# Altium PCB DT10966_MOTOR_CONTROLLER.PcbDoc (part 4 of 8)
Units mm, origin at the board's own origin, x right, y up, seen from the top; angles counter-clockwise.
Board outline 300 x 19 mm, 10 copper layers (Top Layer, Layer 2 GND, Layer 3 SIG, Layer 4 GND, Layer 5 PWR, Layer 6 PWR, Layer 7 GND, Layer 8 SIG, Layer 9 GND, Bottom Layer), stack 2.418 mm thick; 745 components, 446 nets, 2132 pads, 1222 vias.
Unrouted connection lines stored in the file: 3.
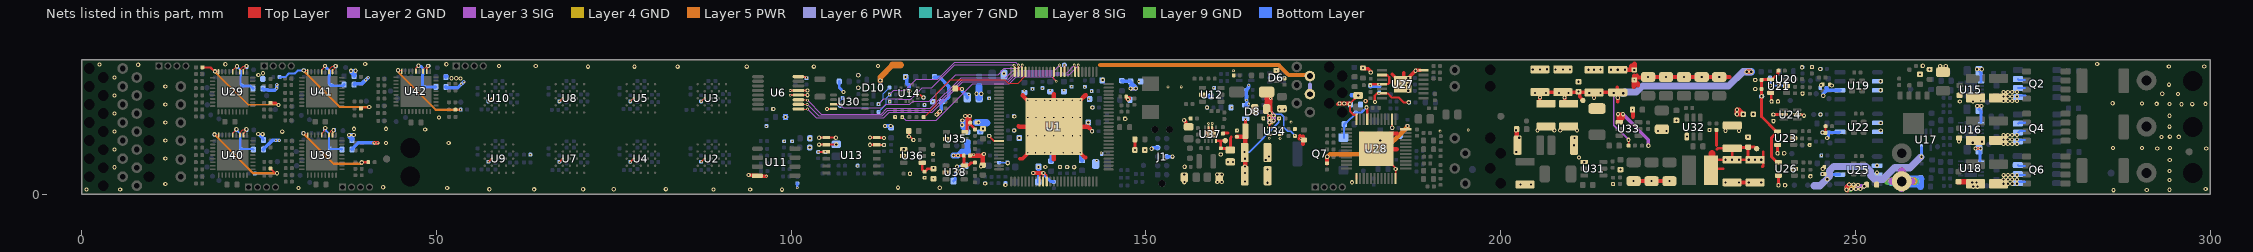
[diagram p11: the nets of this part, all layers, seen from the top]

## Part data (continued)
U20: library part REF3333AIDBZR, "IC VREF SERIES 0.15% SOT23-3", Manufacturer="Texas Instruments", MPN=REF3333AIDBZR
U21 U23 U26: library part CMP-001-2009-1, "IC COMPARATOR 1 GEN PUR SOT23-5", Current - Input Bias (Max)="0.005µA @ 5V", Current - Output (Typ)=21mA, Current - Quiescent (Max)=40µA, Manufacturer="Texas Instruments", Op Temp max=125°C, Op Temp min=-40°C, Package="SC-74A, SOT-753", Ratings=-, Voltage - Input Offset (Max)="1mV @ 5V", Voltage - Supply, Single/Dual (±)="2.7V ~ 5.5V", CMRR, PSRR (Typ)="70dB CMRR, 85dB PSRR", ComponentLink1Description=Datasheet, ComponentLink1URL=https://www.ti.com/lit/ds/symlink/tlv3201.pdf?HQS=dis-dk-null-digikeymode-dsf-pf-null-wwe&ts=1745660417910&ref_url=https%253A%252F%252Fwww.ti.com%252Fgeneral%252Fdocs%252Fsuppproductinfo.tsp%253FdistId%253D10%2526gotoUrl%253Dhttps%253A%252F%252Fwww.ti.com%252Flit%252Fgpn%252Ftlv3201, ComponentLink2Description=Mouser, ComponentLink2URL=https://eu.mouser.com/ProductDetail/Texas-Instruments/TLV3201AIDBVR?qs=5771e39Rz9GGuYwPEKy7fA%3D%3D, ComponentLink3Description=Digikey, ComponentLink3URL=https://www.digikey.com/en/products/detail/texas-instruments/TLV3201AIDBVR/3188691?s=N4IgTCBcDaICoBkBqBmMAGAjAQQJIBEAhJAJRAF0BfIA, Hysteresis=1.2mV, Mounting Type=SM, MPN=TLV3201AIDBVR, Number of Elements=1, Output Type=Push-Pull, Propagation Delay (Max)=50ns
U24: "IC GATE OR 1CH 3-INP SC70-6", Manufacturer="Texas Instruments", MPN=SN74LVC1G332DCKR
U27: "IC OPAMP GP 2 CIRCUIT 14HTSSOP", Manufacturer="Texas Instruments", MPN=ALM2403QPWPRQ1
U28: "IC SGNL CONDITIONER LVDT 48HTQFP", Manufacturer="Texas Instruments", MPN=PGA970QPHPR
U29 U39 U40 U41 U42: "IC PROG SENSOR SGNL COND 36VQFN", Manufacturer="Texas Instruments", MPN=PGA900ARHHR
U30: "IC RTC CLK/CALENDAR I2C 8TSSOP", Manufacturer="NXP USA Inc.", MPN=PCA8565TS/1,118
U31 U32 U33: "SIMPLE SWITCHER SYNCHRONOUS BUCK", Current - Output=3.5A, Frequency - Switching=400kHz, Manufacturer="Texas Instruments", Operating Temperature (MAX)="150°C (TJ)", Operating Temperature (MIN)="-40°C  (TJ)", Package / Case="SOT-23-6 Thin, TSOT-23-6", Voltage - Input (Max)=60V, Voltage - Input (Min)=4.3V, Voltage - Output (Max)=30V, Voltage - Output (Min/Fixed)=0.8V, ComponentLink1Description=Datasheet, ComponentLink1URL=https://www.ti.com/lit/ds/symlink/lmr51625.pdf?ts=1742888310253&ref_url=https%253A%252F%252Fwww.ti.com%252Fsitesearch%252Fen-us%252Fdocs%252Funiversalsearch.tsp%253FlangPref%253Den-US%2526nr%253D3%2526searchTerm%253DLMR51625XDDCR, ComponentLink2Description=DigiKey, ComponentLink2URL=https://www.digikey.com/en/products/detail/texas-instruments/LMR51635XDDCR/25811438?s=N4IgTCBcDaIDIFkBKBWAjANgMwoBoBF8BhJEAXQF8g, ComponentLink3Description=Mouser, ComponentLink3URL=https://eu.mouser.com/ProductDetail/Texas-Instruments/LMR51635XDDCR?qs=a2MtRaTmNORRY9iTmYV%2Fiw%3D%3D, Function=Step-Down, Mounting Type=SM, MPN=LMR51635XDDCR, Output Type=Adjustable, Synchronous Rectifier=Yes, Topology=Buck
U34: "IC REG BUCK ADJ 4A SOT563", Current - Output=4A, Frequency - Switching=1.2MHz, Manufacturer="Texas Instruments", Operating Temperature (MAX)="125°C (TJ)", Operating Temperature (MIN)="-40°C (TJ)", Package / Case="SOT-563, SOT-666", Voltage - Input (Max)=16V, Voltage - Input (Min)=3V, Voltage - Output (Max)=7V, Voltage - Output (Min/Fixed)=0.6V, ComponentLink1Description=Datsheet, ComponentLink1URL=https://www.ti.com/lit/ds/symlink/tps564242.pdf?ts=1750029010480, ComponentLink2Description=DigiKey, ComponentLink2URL=https://www.digikey.at/en/products/detail/texas-instruments/TPS564247DRLR/16585672?s=N4IgTCBcDaICoAUDKBWAbAFjBg7CAugL5A, ComponentLink3Description=Mouser, ComponentLink3URL=https://eu.mouser.com/ProductDetail/Texas-Instruments/TPS564247DRLR?qs=tlsG%2FOw5FFiLH60bcMvlFQ%3D%3D, Function=Step-Down, Mounting Type=SM, MPN=TPS564247DRLR, Output Type=Adjustable, Topology=Buck
U35 U38: "CMOS Amplifier 1 Circuit Rail-to-Rail SOT-23-6", Manufacturer="Texas Instruments", MPN=OPA320SAIDBVR
U36: library part IC_REF35300QDBVRQ1, "IC VREF SERIES SOT23-6", Current - Output="10 mA", Current - Supply=2.6µA, Mfr_Name="Texas Instruments", Operating Temperature (MAX)="+125°C (TA)", Operating Temperature (MIN)="-40°C (TA)", Package / Case=SOT-23-6, Ratings=AEC-Q100, Temperature Coefficient=15ppm/°C, Tolerance=±0.05%, Voltage - Input="3.25V ~ 6V", Voltage - Output (Min/Fixed)=3V, ComponentLink1Description=Datasheet, ComponentLink1URL=https://www.ti.com/lit/ds/symlink/ref35-q1.pdf?ts=1750582135074&ref_url=https%253A%252F%252Fwww.ti.com%252Fproduct%252FREF35-Q1, ComponentLink2Description=DigiKey, ComponentLink2URL=https://www.digikey.com/en/products/detail/texas-instruments/REF35300QDBVRQ1/21598116?s=N4IgTCBcDaIEoFEBiBmArCgDJgigEQCEA1OHARgAIQBdAXyA, ComponentLink3Description=Mouser, ComponentLink3URL=https://eu.mouser.com/ProductDetail/Texas-Instruments/REF35300QDBVRQ1?qs=HoCaDK9Nz5eVknlU2N7cQg%3D%3D, Mounting Type=SM, MPN=REF35300QDBVRQ1, Noise - 0.1Hz to 10Hz=3.8ppmp-p, Noise - 10Hz to 10kHz=0.7ppmrms, Output Type=Fixed, Reference Type=Series
U37: "IC REG BUCK ADJ 1.2A 8WSON", Manufacturer="Texas Instruments", MPN=TPS62080ADSGR
X1 X2 X3 X4 X5 X6 X7 X8 X9 X10 X11 X12 X13 X14 X15 X16 X17 X18 X19 X20 X21 X22 X23 X24 X25 X26 X27 X28 X29 X30 X36 X37: library part PinTH_0.6mm, "Pin 0.6mm diameter for 26AWG", Current Rating (Amps)=3A, Voltage Rating=250V, ComponentLink1Description=DigiKey, ComponentLink2Description=Datasheet, ComponentLink3Description=Mouser, Contact Type="Male Pin", Diameter=0.6mm, Mounting Type=TH, Termination=Solder
X31 X32 X33 X34 X35: "Pin 1.0mm diameter for 20AWG", Current Rating (Amps)=3A, Voltage Rating=250V, ComponentLink1Description=DigiKey, ComponentLink2Description=Datasheet, ComponentLink3Description=Mouser, Contact Type="Male Pin", Diameter=0.9mm, Mounting Type=TH, Termination=Solder
Y1: library part STDCSU2-20M, "CRYSTAL 20.0000MHZ 8PF SMD", Manufacturer="NDK (NIHON DEMPA KOGYO CO., LTD)", MPN=STDCSU2-20M
Y2: library part CMP-001-1983-1, "CRYSTAL 32.7680KHZ 9PF SMD", F Tolerance=±10ppm, Manufacturer="Abracon LLC", Op Temp max=125°C, Op Temp min=-40°C, Package="2-SMD, No Lead", Ratings=AEC-Q200, C load=9pF, ComponentLink1Description=Datasheet, ComponentLink1URL=https://abracon.com/datasheets/ABS07AIG.pdf, ComponentLink2Description=Mouser, ComponentLink2URL=https://eu.mouser.com/ProductDetail/ABRACON/ABS07AIG-32.768KHZ-9-1-T?qs=gG6m684uYP5Ouz7KwhjT2A%3D%3D, ComponentLink3Description=Digikey, ComponentLink3URL=https://www.digikey.com/en/products/detail/abracon-llc/ABS07AIG-32-768KHZ-9-1-T/5817553, ESR=80k, F=32.768kHz, F Stability=-, Height max=900µm, Mounting Type=SM, MPN=ABS07AIG-32.768KHZ-9-1-T, Size="3.20mm x 1.50mm"
Z1 Z2 Z3 Z4 Z5 Z6: MPN=Fiducail

## Free pads (board coordinates)
  round 0 hole 2.8 unplated: 2(46.321,6.537) 2(46.321,2.537) 2(297.5,3) 2(297.5,9.5) 2(297.5,16)
  round 0 hole 1.5 unplated: 3(1.07,2.501) 3(1.07,5.041) 3(1.07,7.581) 3(1.07,10.121) 3(1.07,12.661) 3(1.07,15.201) 3(1.07,17.741) 3(3.07,1.231) 3(3.07,3.771) 3(3.07,6.311) 3(3.07,8.851) 3(3.07,11.391) 3(3.07,13.931) 3(3.07,16.471) 3(9.5,2.501) 3(9.5,5.041) 3(9.5,7.581) 3(9.5,10.121) 3(9.5,12.661) 3(9.5,15.201) 3(175.8,12.861) 3(175.8,15.401) 3(175.8,17.941) 3(177.673,11.591) 3(177.673,14.299) 3(177.673,16.671) 3(198.53,3.692) 3(198.53,7.942) 3(198.53,15.242) 3(198.53,17.567) 3(200,1.567) 3(200,5.817)

## Via types
v1: diameter 0.6, hole 0.3, Top Layer to Bottom Layer, tented both sides, 726 vias
v2: diameter 0.4, hole 0.2, Top Layer to Bottom Layer, tented both sides, 493 vias
v3: diameter 0.5, hole 0.2, Top Layer to Bottom Layer, tented both sides, 3 vias

## Nets (pads, with @x,y where several pads share a name; then routed paths per layer and width w, separated by ;. In a path a pad name is that pad's centre, name@x,y a point inside that pad or via, vN(x,y) a via of type N, cw(c..) or ccw(c..) an arc to the next point about the centre after c; other vN are vias at no path point)
5V0_VDD1: C140.2 C146.2 FB12.2 U29.5 | length 6
  Top Layer w0.15: U29.5@21.295,17.274 21.295,17.505 21.851,18.061 v1(21.922,18.061)
  Bottom Layer w0.15: C146.2@21.915,17.969 21.915,18.053 v1(21.922,18.061)
  Bottom Layer w0.3: v1(21.922,18.061) 21.922,17.981 22.472,17.432 22.472,16.712 22.416,16.656 22.416,15.489 22.57,15.335 C140.2@22.57,15.315
  Bottom Layer w0.4: C140.2@22.581,15.283 23.833,15.283 24.146,14.97 FB12.2@24.146,14.915
5V0_VDD2: C212.2 C218.2 FB17.2 U40.5 | length 5.9
  Top Layer w0.15: U40.5@21.321,8.362 21.321,8.642 21.816,9.137 v1(21.816,9.175)
  Bottom Layer w0.15: v1(21.816,9.175) C218.2@21.823,9.169
  Bottom Layer w0.3: C218.2@21.823,9.137 21.823,9.047 21.856,9.047 22.383,8.52 22.383,7.879 22.357,7.853 22.357,6.502 C212.2@22.441,6.417 24.11,6.417 FB17.2@24.215,6.313
5V0_VDD3: C222.2 C228.2 FB18.2 U41.5 | length 6
  Top Layer w0.15: U41.5@33.862,17.274 33.862,17.553 33.907,17.598 33.907,17.614 34.317,18.023 v1(34.317,18.074)
  Bottom Layer w0.4: v1(34.317,18.074) 34.317,18.061 34.633,17.745 34.659,17.745 34.927,17.477 34.927,16.719 34.894,16.686 34.894,15.654 35.03,15.518 35.03,15.498 C228.2@35.09,15.438 ; C228.2@35.15,15.374 35.15,15.358 35.523,15.358 35.575,15.306 36.852,15.306 FB18.2@37.012,15.466
5V0_VDD4: C202.2 C208.2 FB16.2 U39.5 | length 6.1
  Top Layer w0.15: U39.5@33.862,8.362 33.891,8.392 33.891,8.647 34.274,9.029 34.274,9.284 v1(34.338,9.348)
  Bottom Layer w0.3: v1(34.338,9.348) 34.338,9.108 34.895,8.551 34.895,7.909 34.848,7.862 34.848,6.627 34.965,6.51 C208.2@34.965,6.49 35.045,6.41 36.615,6.41 FB16.2@36.694,6.33
5V0_VDD5: C232.2 C238.2 FB19.2 U42.5 | length 6.1
  Top Layer w0.15: U42.5@47.13,17.34 47.13,17.782 v1(47.481,18.133)
  Bottom Layer w0.4: v1(47.481,18.133) 47.567,18.048 47.795,18.048 48.095,17.748 48.095,16.908 48.057,16.87 48.057,15.329 48.214,15.172 48.214,15.152 49.927,15.152 FB19.2@49.932,15.147
+3V3: C8.2 C12.2 C26.2 C41.2 C81.2 C92.2 C99.2 C101.2 C103.2 C104.2 C108.2 C110.2 C174.2 C175.2 C176.2 C187.2 C189.2 C190.2 C191.2 C192.2 C200.2 D1.1 D2.1 D3.1 D4.1 D8.1 FB1.1 FB2.1 FB3.1 FB4.1 FB5.1 FB6.1 FB7.1 FB8.1 FB9.2 FB10.2 FB13.1 L5.2 R207.1 R210.1 R218.2 R223.2 R227.2 TP44.1 U17.5 U19.6 U21.5 U22.6 U23.5 U24.5 U25.6 U26.5 U35.6 U36.4 U37.8 U38.6 | length 106.8
  Top Layer w0.4: U36.4@118.459,4.459 118.459,3.531 118.788,3.202 C190.2@118.808,3.202 118.828,3.202 118.981,3.355 118.981,3.375 119.215,3.61 C189.2@120.035,3.61 ; v1(122.857,5.473) 122.863,5.479 123.508,5.479 v1(123.514,5.485) ; v1@123.517,5.482 123.532,5.467 124.298,5.467 C187.2@124.312,5.453 124.351,5.414 124.351,4.088 U38.6@124.39,4.049 124.485,4.145 125.066,4.145 125.382,4.461 125.874,4.461 R227.2@125.889,4.476 ; U35.6@124.476,8.773 124.679,8.773 124.784,8.878 124.784,9.612 ; C200.2@125.147,9.975 124.784,9.612 ; C200.2@125.207,10.096 C200.2@125.188,10.115 ; C200.2@125.217,10.086 125.267,10.036 125.267,9.842 125.836,9.273 125.836,9.229 125.872,9.193 R223.2@125.916,9.193 ; FB4.1@148.433,7.755 148.435,7.753 148.435,6.258 v1(148.438,6.255) ; U37.8@159.905,7.548 160.389,7.548 ; R210.1@160.835,8.571 160.903,8.64 161.546,8.64 ; TP44.1@161.171,7.574 161.144,7.548 160.389,7.548 ; 162.017,8.089 161.89,7.962 C191.2@161.89,6.254 161.7,6.444 160.602,6.444 C192.2@160.542,6.504 160.542,7.394 160.389,7.548 ; L5.2@164.004,8.895 164.018,8.908 v2(164.018,10.571) ; U21.5@238.014,14.303 238.109,14.208 238.109,13.118 C99.2@238.141,13.086 ; v1(238.141,13.107) C99.2@238.141,13.086 ; C99.2@238.169,13.058 C99.2@238.141,13.086 ; v1(238.402,11.239) U24.5@239.843,11.239 ; C104.2@238.996,5.786 v1(239.005,5.796) 239.005,6.96 U23.5@239.015,6.969 ; U26.5@239.106,2.639 239.116,2.629 239.116,1.299 v1(239.126,1.289) ; v1@124.522,11.006 125.147,10.381 125.147,10.156 C200.2@125.188,10.115 ; v1@124.522,11.006 v1(124.522,11.029) 124.528,11.035 125.162,11.035 v1(125.168,11.041) 125.188,11.022 C200.2@125.188,10.115 ; v1@124.522,11.006 124.522,10.975 124.784,10.713 124.784,9.612
  Top Layer w0.5: v1(120.501,11.241) 120.501,11.246 120.935,11.681 v1(120.935,11.686)
  Top Layer w0.6: C174.2@162.793,8.118 163.879,8.118 L5.2@163.973,8.211 ; v1(163.928,1.796) 163.973,1.841 L5.2@163.973,8.211 ; L5.2@163.973,8.308 L5.2@163.973,8.211 ; L5.2@164.004,8.895 163.973,8.863 L5.2@163.973,8.211
  Layer 2 GND w0.5: v1(120.501,11.241) 120.501,11.246 120.935,11.681 v1(120.935,11.686)
  Layer 9 GND w0.5: v1(120.501,11.241) 120.501,11.246 120.935,11.681 v1(120.935,11.686)
  Layer 5 PWR w0.5: v1(120.501,11.241) 120.501,11.246 120.935,11.681 v1(120.935,11.686)
  Layer 6 PWR w0.5: v1(147.841,14.913) 147.844,14.909 148.547,14.909 v1(148.551,14.905)
  Layer 6 PWR w1: 244.165,1.22 244.994,1.22 246.301,2.527 246.301,3.334 246.886,3.92 251.458,3.92 252.071,3.307 252.071,2.699 252.64,2.13 253.857,2.13 255.481,3.753 257.659,3.753 v1@259.2,5.295
  Layer 4 GND w0.5: v1(120.501,11.241) 120.501,11.246 120.935,11.681 v1(120.935,11.686)
  Layer 7 GND w0.5: v1(120.501,11.241) 120.501,11.246 120.935,11.681 v1(120.935,11.686)
  Layer 3 SIG w0.5: v1(120.501,11.241) 120.501,11.246 120.935,11.681 v1(120.935,11.686)
  Layer 8 SIG w0.5: v1(120.501,11.241) 120.501,11.246 120.935,11.681 v1(120.935,11.686)
  Bottom Layer w0.2: v1(163.896,5.953) 164.528,5.953 168.713,10.137 168.713,10.678 v2(168.751,10.716)
  Bottom Layer w0.4: FB13.1@106.77,15.911 106.77,15.04 v1(107.375,14.435) ; FB8.1@113.873,9.605 FB8.1@113.932,9.546 ; v1(114.035,9.649) 114.012,9.626 FB8.1@113.932,9.546 ; FB8.1@114.092,9.385 FB8.1@113.932,9.546 ; D2.1@122.877,1.878 123.112,2.113 123.112,2.945 123.37,3.203 v1(123.37,3.257) 123.367,3.259 123.367,3.922 v1(123.365,3.924) 123.403,3.963 124.476,3.963 D3.1@124.539,4.026 ; C26.2@126.202,13.919 C26.2@126.476,13.645 ; C26.2@126.486,13.655 C26.2@126.476,13.645 ; FB3.1@126.486,15.175 FB3.1@126.551,15.24 ; FB3.1@126.496,15.24 FB3.1@126.551,15.24 ; FB3.1@126.711,15.08 FB3.1@126.551,15.24 ; C26.2@126.713,13.408 C26.2@126.476,13.645 ; D4.1@134.819,1.74 134.837,1.758 134.837,3.853 v1(134.856,3.872) ; v1(245.986,7.927) 245.986,7.981 246.152,8.147 246.152,8.671 C101.2@246.212,8.731 ; v1(246.006,2.129) 246.006,2.183 246.094,2.272 246.094,2.806 C108.2@246.154,2.866 246.154,2.854 246.214,2.794 U25.6@247.756,2.794 ; C101.2@246.272,8.731 247.728,8.731 U22.6@247.799,8.803 ; U17.5@259.279,6.595 v1(259.279,5.295) 259.279,5.241 C81.2@259.308,5.212
  Bottom Layer w0.5: FB9.2@120.184,16.512 120.92,16.512 122.176,15.257 122.176,13.693 121.652,13.169 121.385,13.169 FB10.2@121.275,13.059 121.171,12.956 121.171,11.949 120.935,11.713 v1(120.935,11.686) 120.935,11.681 120.501,11.246 v1(120.501,11.241) ; FB1.1@146.601,16.016 146.653,15.964 147.777,15.964 147.777,15.914 C8.2@148.079,15.612 ; v1(245.429,13.892) 245.448,13.912 245.448,14.203 245.887,14.643 245.887,14.999 C92.2@245.897,15.009 245.897,14.989 246.219,14.667 U19.6@247.786,14.667 ; C8.2@148.079,15.612 148.079,15.312 148.181,15.21 ; C8.2@148.079,15.612 148.331,15.36 ; C8.2@148.079,15.612 147.86,15.392 147.86,14.932 v1(147.841,14.913) 147.848,14.905 148.181,14.905 ; 148.181,14.905 148.181,15.21 ; 148.181,14.905 v1(148.551,14.905) 148.531,14.924 148.531,15.159 148.331,15.36 ; 148.181,15.21 148.331,15.36 ; U19.6@247.786,14.667 U19.6@247.786,14.667
  Bottom Layer w0.6: v1@113.229,9.626 FB8.1@114.012,9.626
  Bottom Layer w0.8: v1(99.205,10.915) FB5.1@99.219,10.901 ; v1(122.857,5.473) 123.501,5.473 v1(123.514,5.485) 124.07,6.042 124.927,6.042 FB2.1@124.942,6.057 124.917,6.057 124.849,6.124 124.849,7.345 124.834,7.36 C12.2@124.814,7.36
  Bottom Layer w1: C26.2@126.486,13.655 FB3.1@126.486,15.175
  other v1: 116.745,2.908 163.928,3.034 120.035,3.71 163.928,3.92 163.928,5.018 102.614,6.604 113.212,9.643 126.109,14.175 126.785,14.183
  other v2: 162.075,12.228
+5V0: C181.2 C182.2 C183.2 C184.2 C185.2 C186.2 C250.2 C251.2 C252.2 D5.1 FB11.1 FB12.1 FB16.1 FB17.1 FB18.1 FB19.1 L4.2 R9.1 R204.2 R219.2 TP43.1 U34.1 | length 114.5
  Top Layer w0.2: R219.2@218,6.834 R219.2@218,6.882 ; R219.2@218,6.835 v1(217.999,7.685)
  Top Layer w0.3: U34.1@167.377,9.408 167.397,9.408 167.397,10.055 167.407,10.065 v1(167.407,10.123) 167.407,10.693 C182.2@167.417,10.703
  Top Layer w0.4: v2(170.985,8.321) 170.985,8.255 R9.1@170.99,8.251
  Top Layer w0.5: v2(41.242,7.25) v2(41.765,7.25) ; C251.2@206.356,12.776 205.816,12.776 205.516,13.076 C252.2@205.516,14.411 C185.2@208.738,14.411 ; C185.2@208.755,14.411 208.755,14.342 208.986,14.111 208.986,13.076 209.286,12.776 C184.2@209.552,12.776 ; C185.2@208.845,14.411 208.872,14.385 C183.2@211.074,14.385 ; v1(210.933,14.477) 210.983,14.477 C183.2@211.074,14.385 ; TP43.1@211.56,13.228 211.56,13.296 211.118,13.739 211.118,14.342 C183.2@211.074,14.385 ; v1(213.138,13.609) C250.2@213.138,14.359 ; v1(215.912,14.284) 215.811,14.385 C183.2@211.074,14.385 ; 216.432,15.12 216.432,14.397 C186.2@216.471,14.359 v1(216.471,13.609) ; v1@216.449,13.609 216.449,13.083 216.471,13.061
  Top Layer w0.6: v1(167.413,10.758) 167.413,10.707 C182.2@167.417,10.703 167.43,10.717 C181.2@167.43,11.435 ; v1(167.437,11.428) 167.543,11.534 167.543,12.752 ; v1(234.663,17.281) v1(235.284,17.281) ; C181.2@166.993,12.037 166.993,12.202 C181.2@167.43,12.639 ; C181.2@166.993,12.037 166.993,11.872 C181.2@167.43,11.435 ; C181.2@166.993,12.037 166.991,12.038 166.991,14.424 D5.1@166.99,14.425 167.07,14.425 167.543,13.952 v2(167.543,13.512) 167.543,12.752 ; C181.2@167.43,11.435 C181.2@167.43,12.639 ; C181.2@167.43,12.639 167.543,12.752
  Layer 2 GND w0.5: v2(41.242,7.25) v2(41.765,7.25)
  Layer 2 GND w0.6: v1(234.663,17.281) v1(235.284,17.281) ; v1(167.407,10.123) 167.407,11.398 v1(167.437,11.428) 167.681,11.428 v1(167.986,11.123) 167.986,10.426 v1(167.957,10.397) 167.68,10.397 v1(167.407,10.123)
  Layer 9 GND w0.5: v2(41.242,7.25) v2(41.765,7.25)
  Layer 9 GND w0.6: v1(167.407,10.123) v1@167.437,10.153 ; v1(234.663,17.281) v1(235.284,17.281) ; v1@167.437,10.153 v1(167.437,11.428) 167.742,11.123 v1(167.986,11.123) 167.957,11.094 v1(167.957,10.397) 167.68,10.397 v1@167.437,10.153
  Layer 5 PWR w0.5: v2(41.242,7.25) v2(41.765,7.25)
  Layer 5 PWR w0.6: v1(167.407,10.123) v1@167.437,10.153 ; v1(234.663,17.281) v1(235.284,17.281) ; v1@167.437,10.153 v1(167.437,11.428) 167.742,11.123 v1(167.986,11.123) 167.957,11.094 v1(167.957,10.397) 167.68,10.397 v1@167.437,10.153
  Layer 6 PWR w1: v1(217.248,14.244) 217.409,14.404 219.133,14.404 219.976,15.248 232.105,15.248 234.138,17.281 v1(234.663,17.281) v1@235.189,17.281
  Layer 4 GND w0.5: v2(41.242,7.25) v2(41.765,7.25)
  Layer 4 GND w0.6: v1(234.663,17.281) v1(235.284,17.281) ; v1(167.407,10.123) 167.437,10.153 v1(167.437,11.428) 167.681,11.428 v1(167.986,11.123) 167.957,11.094 v1(167.957,10.397) 167.684,10.123 v1(167.407,10.123)
  Layer 7 GND w0.5: v2(41.242,7.25) v2(41.765,7.25)
  Layer 7 GND w0.6: v1(234.663,17.281) v1(235.284,17.281) ; v1(167.407,10.123) 167.407,11.398 v1(167.437,11.428) 167.681,11.428 v1(167.986,11.123) 167.957,11.094 v1(167.957,10.397) 167.68,10.397 v1(167.407,10.123)
  Layer 3 SIG w0.2: v1(215.912,14.284) 215.912,9.773 v1(217.999,7.685)
  Layer 3 SIG w0.5: v2(41.242,7.25) v2(41.765,7.25)
  Layer 3 SIG w0.6: v1(234.663,17.281) v1(235.284,17.281) ; v1@167.419,10.12 167.419,11.395 167.449,11.425 167.693,11.425 167.998,11.12 167.998,10.422 167.969,10.393 167.692,10.393 v1@167.419,10.12
  Layer 8 SIG w0.5: v2(41.242,7.25) v2(41.765,7.25)
  Layer 8 SIG w0.6: v1(234.663,17.281) v1(235.284,17.281) ; v1(167.407,10.123) 167.407,11.398 v1(167.437,11.428) 167.681,11.428 v1(167.986,11.123) 167.986,10.426 v1(167.957,10.397) 167.68,10.397 v1(167.407,10.123)
  Bottom Layer w0.2: v1(167.986,11.123) 168.094,11.123 168.246,11.274 169.079,11.274 169.443,10.91 169.443,9.445 169.986,8.902 170.404,8.902 v2(170.985,8.321)
  Bottom Layer w0.5: FB12.1@25.556,14.915 25.556,14.86 25.666,14.75 26.26,14.75 26.336,14.674 27.22,14.674 v2(27.515,14.969) 27.515,15.447 v2(27.524,15.456) ; FB17.1@25.625,6.313 25.735,6.423 25.735,6.478 26.855,7.598 27.421,7.598 27.426,7.603 v2(27.858,7.603) ; FB16.1@38.104,6.33 38.214,6.44 38.214,6.495 38.969,7.25 v2(41.242,7.25) v2(41.765,7.25) ; FB18.1@38.422,15.466 38.422,15.508 38.532,15.618 39.532,15.618 40.371,16.457 v2(40.389,16.457) ; FB19.1@51.342,15.147 51.342,15.121 51.452,15.011 52.992,15.011 53.645,15.664 53.695,15.664 53.878,15.847 v2(53.883,15.847)
  Bottom Layer w0.6: v1(167.407,10.123) 167.407,11.398 v1(167.437,11.428) 167.681,11.428 v1(167.986,11.123) 167.957,11.094 v1(167.957,10.397) 167.68,10.397 v1(167.407,10.123)
  Bottom Layer w1: v1(234.663,17.281) v1(235.284,17.281)
  other v1: 205.516,13.661 208.986,13.661 204.831,14.284 206.356,14.284 208.202,14.284 209.552,14.284 212.455,14.284 214.024,14.284
  other v2: 27.383,7.598 53.519,15.537 40.046,16.133
+12V0: C73.2 C80.2 C88.2 C169.2 C170.2 C171.2 C172.2 L3.2 R213.2 TP42.1 U15.1 U16.1 U18.1 | length 45.2
  Top Layer w0.4: 230.384,6.874 R213.2@230.384,9.091 ; 230.449,6.362 230.594,6.507 C170.2@232.614,6.507 ; 231.35,3.602 229.85,3.602 229.764,3.516 L3.2@229.637,3.389 229.637,4.084 229.764,4.211 230.427,4.874 v1(231.675,4.874) v1(232.6,4.874) ; v1(235.827,4.874) v1(234.934,4.874) ; TP42.1@236.05,6.445 235.956,6.445 235.734,6.666 C169.2@234.849,6.666 ; 236.836,3.889 236.975,4.028 236.975,5.972 ; v1(266.897,6.462) v1(267.58,6.462) ; v1(267.12,17.623) v1(267.777,17.623) ; v1(267.14,12.453) v1(267.736,12.453) ; v1(232.6,4.874) v1(234.934,4.874) ; v1(232.6,4.874) 232.607,4.881 232.607,6.5 C170.2@232.614,6.507 ; C170.2@232.614,6.507 232.694,6.587 234.769,6.587 C169.2@234.849,6.666 ; C169.2@234.849,6.666 234.849,4.959 v1(234.934,4.874)
  Top Layer w1: L3.2@229.764,3.516 229.764,4.211 229.764,5.75
  Layer 2 GND w0.4: v1(266.897,6.462) v1(267.58,6.462) ; v1(267.12,17.623) v1(267.777,17.623) ; v1(267.14,12.453) v1(267.736,12.453)
  Layer 9 GND w0.4: v1(266.897,6.462) v1(267.58,6.462) ; v1(267.12,17.623) v1(267.777,17.623) ; v1(267.14,12.453) v1(267.736,12.453)
  Layer 6 PWR w0.4: v1(266.897,6.462) v1(267.58,6.462) ; v1(267.12,17.623) v1(267.777,17.623) ; v1(267.14,12.453) v1(267.736,12.453)
  Layer 4 GND w0.4: v1(266.897,6.462) v1(267.58,6.462) ; v1(267.12,17.623) v1(267.777,17.623) ; v1(267.14,12.453) v1(267.736,12.453)
  Layer 7 GND w0.4: v1(267.12,17.623) v1(267.777,17.623) ; v1(267.14,12.453) v1(267.736,12.453)
  Layer 3 SIG w0.4: v1(266.897,6.462) v1(267.58,6.462) ; v1(267.12,17.623) v1(267.777,17.623) ; v1(267.14,12.453) v1(267.736,12.453)
  Layer 8 SIG w0.4: v1(266.897,6.462) v1(267.58,6.462) ; v1(267.12,17.623) v1(267.777,17.623) ; v1(267.14,12.453) v1(267.736,12.453)
  Bottom Layer w0.4: C80.2@267.38,12.003 267.643,11.74 U16.1@267.643,10.175 ; C73.2@267.386,17.404 267.651,17.14 U15.1@267.651,15.847 ; U18.1@267.515,4.739 267.515,6.031 267.38,6.166 267.58,6.367 v1(267.58,6.462)
  other v1: 233.556,4.874 236.692,4.874
ACCL_\I\N\T\0\: R109.1 U1.88 | length 26.2
  Top Layer w0.15: U1.88@137.011,17.262 137.011,16.282 v2(137.361,15.932)
  Layer 3 SIG w0.15: v2(115.645,10.88) 115.713,10.88 116.125,10.468 120.441,10.468 125.589,15.617 130.732,15.617 131.721,16.606 136.687,16.606 v2(137.361,15.932)
ACCL_\I\N\T\1\: R110.1 U1.96 | length 18.7
  Top Layer w0.127: R110.1@118.653,10.885 118.698,10.885 118.908,11.095 118.932,11.095 120.46,12.623 120.46,14.193 122.435,16.167 130.103,16.167 130.596,15.674 131.998,15.674 133.011,16.687 U1.96@133.011,17.262
AFE_AVDD1: C147.2 R72.2 R188.2 U29.9 | length 14.7
  Top Layer w0.15: U29.9@19.253,17.339 19.295,17.297 U29.9@19.295,17.274
  Top Layer w0.2: v1@18.719,17.339 v1(18.8,17.339) U29.9@19.253,17.339
  Top Layer w0.3: R72.2@17.035,17.906 17.066,17.875 18.182,17.875 v1@18.719,17.339 ; R188.2@26.635,12.91 27.378,12.91 27.679,12.609 v1(27.761,12.609)
  Layer 5 PWR w0.2: v1(18.8,17.339) 18.8,17.271 23.462,12.609 v1(27.761,12.609)
AFE_AVDD2: C219.2 R74.2 R245.2 U40.9 | length 15.9
  Top Layer w0.15: v1@18.751,8.397 19.287,8.397 U40.9@19.321,8.362
  Top Layer w0.3: v1@18.67,8.397 v1@18.751,8.397 ; R245.2@26.666,3.612 27.244,3.035 27.472,3.035 v1(27.529,2.977)
  Layer 5 PWR w0.3: v1@18.751,8.397 24.171,2.977 v1(27.529,2.977)
  Bottom Layer w0.15: C219.2@18.751,8.397 C219.2@18.758,8.405
  Bottom Layer w0.3: R74.2@24.433,2.92 27.235,2.92 27.472,2.92 v1(27.529,2.977)
  other v1: 18.745,8.454
AFE_AVDD3: C229.2 R78.2 R255.2 U41.9 | length 17.1
  Top Layer w0.15: v1(31.317,17.458) 31.32,17.456 31.82,17.456 31.862,17.415 U41.9@31.862,17.274 ; R255.2@39.366,12.096 39.491,12.221 40.455,12.221 v1(40.541,12.307)
  Top Layer w0.3: v1@31.282,17.423 v1(31.317,17.458)
  Layer 5 PWR w0.3: v1(31.317,17.458) 31.317,17.384 36.394,12.307 v1(40.541,12.307)
  Bottom Layer w0.3: R78.2@27.912,16.392 R78.2@27.962,16.442 ; R78.2@28.092,16.527 28.712,16.527 29.223,17.037 30.067,17.037 30.462,17.432 31.291,17.432 v1(31.317,17.458)
AFE_AVDD4: C209.2 R73.2 R230.2 U39.9 | length 11.7
  Top Layer w0.15: v1@31.319,8.575 31.82,8.575 31.862,8.533 U39.9@31.862,8.362
  Top Layer w0.4: v1@31.232,8.607 v1(31.287,8.607) ; v1(39.484,4.515) 39.491,4.522 40.388,4.522 R73.2@40.396,4.53
  Layer 5 PWR w0.3: v1@31.287,8.525 35.502,4.31 v1@39.508,4.31
AFE_AVDD5: C239.2 R89.2 R265.2 U42.9 | length 12.8
  Top Layer w0.15: v1(44.587,17.485) 45.089,17.485 45.13,17.444 U42.9@45.13,17.34 ; R265.2@52.681,11.926 52.686,11.922 53.402,11.922 v2(53.406,11.917)
  Top Layer w0.3: v1@44.506,17.485 v1(44.587,17.485)
  Layer 5 PWR w0.3: v1(44.587,17.485) 44.645,17.428 44.645,17.186 49.913,11.917 v2(53.406,11.917)
  Bottom Layer w0.3: R89.2@53.439,11.969 R89.2@53.478,11.93
AFE_DVDD1: C148.2 U29.2 U29.3 | length 2.4
  Top Layer w0.15: U29.3@22.295,17.274 22.295,17.553 22.34,17.598 22.34,17.624 22.796,18.081 v1@23.232,18.081 ; U29.2@22.795,17.274 22.795,17.553 22.84,17.598 22.84,17.602 23.24,18.002 v1(23.24,18.073)
AFE_DVDD2: C220.2 U40.2 U40.3 | length 2.3
  Top Layer w0.15: U40.3@22.321,8.362 22.321,8.642 22.366,8.687 22.366,8.708 22.749,9.091 v1@23.136,9.091 ; U40.2@22.821,8.362 22.821,8.593 22.891,8.662 22.912,8.662 22.999,8.75 23.136,8.887 v1@23.136,9.091 ; v1(23.222,9.177) v1@23.136,9.091
AFE_DVDD3: C230.2 U41.2 U41.3 | length 2.4
  Top Layer w0.15: U41.3@34.862,17.274 34.862,17.529 35.354,18.021 35.759,18.021 v1(35.812,18.074) 35.812,17.952 35.66,17.8 35.66,17.782 35.54,17.662 35.452,17.574 35.431,17.574 35.362,17.505 U41.2@35.362,17.274
AFE_DVDD4: C210.2 U39.2 U39.3 | length 1.8
  Top Layer w0.15: U39.3@34.862,8.362 34.891,8.392 34.891,8.647 35.253,9.008 35.483,9.008 v1(35.512,9.038) ; U39.2@35.362,8.362 35.362,8.642 35.466,8.746 35.466,8.83 35.508,8.872 v1@35.508,9.008
AFE_DVDD5: C240.2 U42.2 U42.3 | length 2
  Top Layer w0.15: U42.3@48.13,17.34 48.16,17.369 48.16,17.624 48.551,18.015 48.756,18.015 v1(48.842,18.101) 48.805,18.064 48.805,17.788 48.63,17.614 U42.2@48.63,17.34
AGND: C4.1 C5.1 C6.1 C7.1 C13.1 C14.1 C15.1 C187.1 C188.1 C197.1 C198.1 C199.1 C200.1 C201.1 R240.1 R242.2 U1.17 U1.34 U1.35 U1.36 U35.2 U36.1 U36.2 U38.2 | length 20.7
  Top Layer w0.2: U1.34@135.011,1.812 135.011,2.949 135.084,3.022 ; U1.35@135.511,1.812 135.523,1.824 135.523,2.985 v1(135.534,2.997) 135.674,2.997 135.992,2.679 135.992,1.831 U1.36@136.011,1.812
  Top Layer w0.3: C199.1@116.579,8.923 v1(116.579,8.163) 116.636,8.106 116.801,8.106 117.218,7.688 v1(117.218,7.668) ; v1@127.914,8.231 127.914,8.182 128.558,7.537 U1.17@129.286,7.537
  Top Layer w0.6: C187.1@125.192,5.453 126.924,5.453 v1(127.148,5.676) 127,5.528 C201.1@127,4.126 ; v1(134.121,3.022) 135.084,3.022 135.509,3.022 v1(135.534,2.997) ; v1(233.26,11.299) 233.26,11.916 v1(233.266,11.922) 233.587,11.922 234.169,11.34 v1(234.169,11.285) 234.155,11.299 v1(233.26,11.299)
  Bottom Layer w0.2: C6.1@129.286,4.477 129.298,4.49 130.453,4.49 130.514,4.429 v1(130.514,4.402)
  Bottom Layer w0.4: C13.1@126.637,8.787 126.687,8.787 126.981,9.082 126.981,9.203 v1(127.02,9.241) ; v1(135.534,2.997) 135.572,2.959 135.572,2.821 136.586,1.807 136.971,1.807 C14.1@137.031,1.747
  Bottom Layer w1: 126.017,10.149 v1(126.395,10.149) 127.496,10.149 127.608,10.037
  other v1: 130.177,1.314 127.334,1.527 121.802,3.084 126.745,3.922 115.828,5.466 115.859,6.359 121.888,7.808 127.905,8.231
  other v2: 125.709,5.58 120.002,5.681 191.446,8.915 195.4,9.066
AVDD: C124.2 R71.2 R168.1 TP24.1 U28.12 | length 16.8
  Top Layer w0.3: U28.12@186.602,9.17 186.856,9.17 v1(186.856,9.65)
  Top Layer w0.6: R71.2@175.508,4.392 R168.1@175.508,5.261
  Layer 5 PWR w0.6: v1(175.54,5.293) 175.915,5.668 183.031,5.668 186.821,9.457 186.821,9.615 v1(186.856,9.65)
  Bottom Layer w0.2: TP24.1@185.817,8.17 186.737,9.09 186.737,9.531 v1(186.856,9.65)
  Bottom Layer w0.3: v1(186.856,9.65) C124.2@186.938,9.65
BAT_RTC: D10.2 X36.1 | length 34.1
  Layer 5 PWR w0.6: 143.563,18.217 168.694,18.217 170.102,16.808 172.963,16.808 X36.1@173.1,16.671
  Layer 5 PWR w0.8: v1(112.555,16.035) 112.555,16.483 114.296,18.224
  Layer 5 PWR w1.02: 114.296,18.224 115.356,18.224
BIAS: R180.1 R182.2 TP27.1 U27.2 U27.4 | length 6.1
  Top Layer w0.3: v2(181.603,15.312) 181.618,15.312 181.826,15.52 182.852,15.52 U27.4@183.222,15.52 183.25,15.548 184.096,15.548 184.272,15.724 184.272,16.52 184,16.792 183.25,16.792 U27.2@183.222,16.82
  Bottom Layer w0.6: TP27.1@181.627,15.312 181.655,15.284 182.867,15.284 R182.2@182.869,15.282
  other v2: 182.852,15.502
CLDR_\I\N\T\: R198.1 TP39.1 U1.97 U30.3 | length 31.4
  Top Layer w0.127: U1.97@132.511,17.262 132.531,17.282 132.531,18.193 v2(132.551,18.213)
  Top Layer w0.15: U30.3@105.963,12.709 106.709,12.709 106.845,12.573 v2(106.913,12.573)
  Layer 3 SIG w0.127: v2(106.913,12.573) 107.307,12.179 112.859,12.179 113.356,12.676 116.74,12.676 117.202,13.137 119.478,13.137 123.22,16.879 129.162,16.879 130.037,17.755 132.103,17.755 132.551,18.203 v2(132.551,18.213)
  Bottom Layer w0.15: v2(106.913,12.573) v2(106.913,12.573) 106.913,13.209 107.238,13.533 R198.1@107.238,13.572
COMP_REF: C96.2 R137.1 R138.2 TP12.1 U21.4 U23.4 U26.4 | length 16.6
  Top Layer w0.4: U23.4@239.015,8.869 U23.4@238.815,8.869 ; U26.4@239.106,4.539 239.006,4.639 238.802,4.639 238.133,5.309 238.133,7.987 238.715,8.569 238.715,8.769 U23.4@238.815,8.869 ; R137.1@239.13,17.423 239.055,17.348 239.055,17.045 238.214,16.203 U21.4@238.014,16.203 237.979,16.168 236.779,16.168 R138.2@236.744,16.134 236.739,16.129 236.739,14.842 C96.2@236.734,14.837 236.753,14.818 236.753,13.805 236.771,13.786 236.734,13.749 236.734,10.949 U23.4@238.815,8.869
  other v1: 236.76,13.825
CVAGND: C89.1 C90.1 C92.1 C93.1 C94.1 C95.1 C96.1 C97.1 C99.1 C100.1 C101.1 C102.1 C103.1 C104.1 C105.1 C106.1 C108.1 C109.1 C110.1 C111.1 R132.1 R133.1 R138.1 R142.1 R153.1 R242.1 U19.2 U19.3 U20.3 U21.2 U22.2 U22.3 U23.2 U24.2 U25.2 U25.3 U26.2 | length 5.4
  Top Layer w0.3: U24.2@241.743,11.239 241.762,11.22 242.517,11.22 242.643,11.094 v1(242.724,11.094) ; C97.1@245.743,8.667 245.755,8.679 245.755,9.589 R142.1@245.768,9.602
  Bottom Layer w0.3: C94.1@237.941,16.483 237.96,16.464 237.96,15.374 v1(237.979,15.355) 240.121,15.355 240.199,15.277 v1(240.199,15.23)
  other v1: 240.066,1.289 243.62,2.525 245.322,2.859 253.024,3.057 241.366,3.589 245.374,3.599 253.024,4.07 239.936,5.786 241.275,7.919 245.332,8.731 253.538,8.995 253.538,10.073 238.414,10.321 245.056,11.269 235.579,11.285 239.049,13.106 242.528,14.193 253.525,14.667 235.854,14.837 239.144,15.253 246.632,15.344 245.102,15.389 253.525,15.937 235.844,16.134 245.012,17.676 242.455,17.903 243.836,17.933
  other v2: 245.189,5.493 243.529,6.903
DACCAP: C133.2 U28.14 | length 1.2
  Top Layer w0.3: U28.14@184.682,10.59 184.682,9.404 v1(184.701,9.385)
DGND: C3.1 C8.1 C9.1 C10.1 C11.1 C12.1 C16.1 C17.1 C18.1 C19.1 C20.1 C21.1 C22.1 C23.1 C24.1 C25.1 C26.1 C27.1 C28.1 C29.1 C30.1 C31.1 C32.1 C33.1 C34.1 C35.1 C36.1 C37.1 C38.1 C39.1 C40.1 C41.1 C42.1 C43.1 C44.1 C45.1 C46.1 C47.1 C48.1 C49.1 C50.1 C51.1 C52.1 C53.1 C54.1 C55.1 C56.1 C57.1 C58.1 C59.1 C60.1 C61.1 C62.1 C63.1 C64.1 C65.1 C66.1 C125.2 C150.1 C151.1 C152.1 C153.1 C154.1 C155.1 C156.1 C174.1 C175.1 C176.1 C181.1 C182.1 C183.1 C184.1 C185.1 C186.1 C189.1 C190.1 C191.1 C192.1 C193.1 C194.1 C195.1 C196.1 C250.1 C251.1 C252.1 D6.2 D8.2 D9.2 J1.4 J1.8 R36.1 R49.1 R70.1 R88.1 R103.1 R111.1 R112.1 R160.1 R187.2 R201.2 R206.1 R220.1 R221.1 R225.1 R229.2 R240.2 R244.2 R254.2 R264.2 R288.1 U1.101 U2.B3 U3.B3 U4.B3 U5.B3 U6.4 U6.5 U6.8 U7.B3 U8.B3 U9.B3 U10.B3 U11.4 U12.2 U13.1 U13.2 U13.3 U13.11 U13.12 U14.9 U28.24 U28.37 U30.4 U33.4 U34.3 U34.4 U37.2 U37.3 U37.9 X37.1 | length 122.5
  Top Layer w0.2: v2(57.321,4.597) 57.351,4.597 57.791,5.037 U9.B3@57.821,5.037 ; v2(57.327,13.1) 57.356,13.1 57.793,13.537 U10.B3@57.821,13.537 ; v2(67.321,4.537) U7.B3@67.821,5.037 ; v2(67.327,13.1) 67.355,13.1 67.793,13.537 U8.B3@67.821,13.537 ; v2(77.321,4.553) 77.329,4.553 77.814,5.037 U4.B3@77.821,5.037 ; v2(77.321,13.097) 77.351,13.097 77.791,13.537 U5.B3@77.821,13.537 ; v2(87.321,4.597) 87.351,4.597 87.792,5.038 U2.B3@87.821,5.038 ; v2(87.321,13.097) 87.351,13.097 87.791,13.537 U3.B3@87.821,13.537
  Top Layer w0.3: v2(99.862,13.977) 99.867,13.982 101.016,13.982 U6.4@101.021,13.987 101.027,13.982 102.297,13.982 v1(102.302,13.977) ; v2(99.862,14.637) U6.5@101.021,14.637 v1(102.302,14.637) ; U6.8@101.021,16.587 101.05,16.559 102.002,16.559 102.128,16.433 v2(102.155,16.433) ; v2(103.81,5.974) 103.825,5.989 104.81,5.989 v2(104.821,5.977) ; v1(103.941,7.003) U13.2@104.959,7.003 104.981,7.026 106.324,7.026 v1(106.347,7.048) ; v1(103.941,7.984) 103.951,7.993 104.949,7.993 U13.1@104.959,8.003 104.969,7.993 106.283,7.993 v1(106.293,7.984) ; v1(105.038,12.026) 105.055,12.044 105.947,12.044 U30.4@105.963,12.059 ; v1(111.116,6.98) 111.127,6.992 112.06,6.992 U13.11@112.071,7.003 112.098,6.976 113.034,6.976 v1(113.061,6.949) ; v1(111.116,8.003) U13.12@112.071,8.003 112.099,7.976 113.069,7.976 v1(113.096,7.948) ; U14.9@117.821,14.035 117.837,14.019 118.197,14.019 118.57,13.647 v1(118.651,13.647) ; U37.3@158.835,9.421 158.835,8.721 U37.9@159.085,8.471 159.335,8.721 U37.2@159.335,9.421 ; U28.37@179.682,2.274 U28.37@179.682,2.587 ; U28.24@179.682,10.59 179.682,11.225 179.247,11.225 178.729,11.743 178.729,12.71 v1(178.725,12.714) 178.725,12.781 179.417,13.472 179.417,13.577 179.795,13.956 v1(179.901,13.956)
  Top Layer w0.5: v1(94.009,2.727) 94.036,2.727 94.06,2.702 95.161,2.702 U11.4@95.231,2.632 95.296,2.568 v2(96.509,2.568) ; D9.2@123.137,14.912 123.176,14.873 124.064,14.873 v1(124.083,14.854) ; 132.227,5.044 132.616,5.044 133.238,5.667 133.238,5.764 v2(133.311,5.837) ; v2(140.711,5.837) 141.356,5.192 141.522,5.192 ; v1(155.377,10.453) 155.377,10.425 155.573,10.23 155.573,9.784 155.842,9.514 C196.1@156.001,9.514 ; 171.588,7.841 171.63,7.883 v2(171.833,7.883) 172.125,7.591 172.125,7.052 ; 171.683,8.285 171.802,8.166 171.802,8.069 172.197,7.674 R201.2@172.233,7.674 ; 172.123,8.159 172.123,7.784 R201.2@172.233,7.674 ; R201.2@172.252,7.674 R201.2@172.233,7.674 ; v1@177.013,12.684 177.132,12.803 177.916,12.803 v1(177.936,12.822) 177.955,12.803 178.609,12.803 178.698,12.714 v1(178.725,12.714) ; R288.1@218.773,17.561 218.786,17.548 v1(218.797,17.537) ; v1@216.515,11.305 216.531,11.289 v1@216.531,11.262 ; v1@216.515,11.305 v1(216.512,11.308) 216.512,11.281 v1@216.531,11.262 ; v1@216.515,11.305 217.198,11.305 v1(217.201,11.302) 217.182,11.282 217.182,10.648 216.998,10.464 216.998,10.214 216.948,10.164 U33.4@216.698,10.164 ; v1@216.531,11.262 216.698,11.095 U33.4@216.698,10.164 ; v1@216.531,11.262 216.531,10.214 216.581,10.164 U33.4@216.698,10.164
  Top Layer w0.6: 132.045,9.613 132.121,9.537 U1.101@137.011,9.537 ; 132.618,13.962 132.618,13.93 v2(133.311,13.237) ; 136.996,4.916 137.011,4.932 v2(137.011,8.237) U1.101@137.011,9.537 ; 137.046,14.152 137.011,14.117 v2(137.011,10.837) U1.101@137.011,9.537 ; v2(140.711,13.237) 141.442,13.968 141.562,13.968 ; 142.078,9.276 141.817,9.537 U1.101@137.011,9.537 ; C11.1@147.336,13.565 147.336,13.525 v1(147.471,13.39) 147.596,13.516 v1@147.596,13.537 ; v1(217.5,17.559) 217.511,17.548 218.731,17.548 R288.1@218.786,17.548 ; v1@248.84,0.566 248.819,0.566 v1(248.735,0.649) 248.735,1.018 v1(249.098,1.381)
  Top Layer w0.7: 218.392,18.126 218.392,17.886 218.731,17.548 218.742,17.537 v1(218.797,17.537) ; R288.1@218.82,17.56 218.82,18.393
  Layer 2 GND w0.5: v1@217.221,11.282 220.793,7.71 v1(220.793,6.857)
  Layer 9 GND w0.6: v1(249.098,1.381) 249.098,1.012 v1(248.735,0.649) 249.27,0.649 v1(249.38,0.759) ; v1(250.027,0.75) 250.414,1.137 v1(251.213,1.137)
  Layer 5 PWR w0.6: v1(248.735,0.649) 248.735,1.018 v1(249.098,1.381) ; v1(250.344,1.325) 250.532,1.137 v1(251.213,1.137)
  Layer 6 PWR w0.6: X37.1@173.1,14.131 173.1,15.493 ; v1(250.344,1.325) 250.532,1.137 v1(251.213,1.137)
  Layer 4 GND w0.6: v1(248.735,0.649) 249.098,1.012 ; v1(249.098,1.381) 249.098,1.012 ; v1(251.213,1.137) 250.365,1.137 250.344,1.115 249.202,1.115 249.098,1.012
  Layer 7 GND w0.6: 250.589,1.115 251.191,1.115 v1(251.213,1.137)
  Layer 3 SIG w0.6: v1(248.735,0.649) 248.735,1.018 v1(249.098,1.381) ; v1(250.027,0.75) 250.414,1.137 v1(251.213,1.137)
  Layer 8 SIG w0.6: v1(250.027,0.75) 250.414,1.137 v1(251.213,1.137)
  Bottom Layer w0.3: R244.2@25.45,7.899 25.625,7.723 R244.2@25.625,7.657 25.434,7.849 R244.2@25.434,7.92 ; v2(100.863,0.944) R88.1@100.863,1.562 ; 25.217,8.489 25.434,8.271 R244.2@25.434,7.92 ; 25.217,8.489 25.523,8.489 v1(25.526,8.486) 25.576,8.436 25.576,7.92 25.554,7.899 25.455,7.899 R244.2@25.434,7.92 ; 25.217,8.489 24.91,8.489 v1(24.907,8.492) 24.907,8.447 R244.2@25.434,7.92
  Bottom Layer w0.5: 37.733,8.058 38.086,7.705 R229.2@38.086,7.65 38.196,7.76 38.196,8.19 38.35,8.344 v1(38.35,8.371) v1(37.714,8.371) v1@37.733,8.352 ; R264.2@51.225,16.625 R264.2@51.335,16.515 R264.2@51.445,16.625 ; v1(116.121,16.537) 116.256,16.402 116.256,15.637 116.549,15.344 116.609,15.344 116.619,15.334 C62.1@116.619,15.314 116.629,15.304 116.629,14.587 116.653,14.564 v1(116.653,14.537) ; v1(124.083,14.854) 124.102,14.835 124.102,14.509 124.796,13.815 C26.1@124.796,13.645 ; v2(136.59,5.837) 136.617,5.81 C19.1@136.617,4.689 ; v2(140.711,5.837) 140.802,5.746 140.802,4.906 140.937,4.771 C18.1@140.987,4.771 ; v1(150.793,6.435) 150.82,6.435 150.972,6.587 J1.4@151.637,6.587 ; J1.8@152.907,5.317 v1(153.749,5.317) ; 158.12,13.868 158.152,13.835 C57.1@159.149,13.835 ; D8.2@164.043,12.562 164.126,12.562 164.176,12.612 v2(164.176,13.259) 164.149,13.285 R206.1@164.149,14.727 164.149,14.732 164.397,14.98 164.397,15.083 164.486,15.172 v2(164.486,15.378) ; v1(124.09,9.75) 124.11,9.731 124.11,9.415 C12.1@124.476,9.049 ; v1(124.09,9.75) 124.117,9.75 124.351,9.984 R240.2@124.875,9.984 ; v1(124.09,9.75) 124.105,9.765 124.105,10.384 v1(124.12,10.399) 124.148,10.399 124.233,10.314 124.875,10.314 124.985,10.204 R240.2@124.985,10.149 124.985,10.094 R240.2@124.875,9.984 ; C12.1@124.476,9.049 124.764,8.76 C12.1@124.814,8.76 R240.2@124.814,9.923 ; C12.1@124.476,9.049 124.476,9.584 R240.2@124.814,9.923 ; R240.2@124.814,9.923 R240.2@124.875,9.984 ; v1(37.967,17.402) 37.974,17.41 38.608,17.41 v1(38.616,17.418) 38.616,17.391 38.532,17.306 38.532,16.748 R254.2@38.422,16.638 38.422,16.693 37.986,17.129 37.986,17.383 v1(37.967,17.402)
  Bottom Layer w0.6: 178.953,13.956 v1(179.901,13.956) ; v1(248.735,0.649) 249.015,0.929 ; v1(250.344,1.325) 250.532,1.137 v1(251.213,1.137)
  other v1: 98.707,0.662 89.07,0.671 0.692,0.701 5.443,0.701 57.465,0.716 63.783,0.705 94.217,0.698 70.69,0.718 75,0.718 82.339,0.733 250.665,0.759 30.562,0.886 51.522,0.883 115.069,0.944 120.933,0.928 42.5,1.009 249.717,1.366 11.808,1.445 167.102,1.632 179.022,1.698 155.404,1.725 160.058,1.74 160.682,1.766 155.382,2.797 160.034,2.777 160.677,2.777 167.102,3.5 4.644,3.824 139.873,3.839 135.814,3.861 137.886,3.847 138.886,3.847 155.443,3.886 161.546,4.574 162.239,4.568 166.868,4.868 11.808,5.041 167.348,5.311 160.542,5.624 149.838,6.255 4.644,6.311 51.731,7.225 42.908,7.25 11.808,7.581 102.638,7.887 132.135,7.931 28.274,8.836 4.644,8.851 142.378,8.896 131.425,9.016 205.171,9.026 207.541,9.026 208.367,9.026 210.737,9.026 48.418,9.127 38.407,9.229 42.908,9.229 141.866,10.115 11.808,10.121 147.076,10.626 50.387,10.827 131.452,10.981 4.644,11.391 168.803,11.963 169.515,11.97 97.491,12.037 142.437,12.253 158.584,12.256 11.808,12.661 177.275,12.822 4.644,13.931 109.459,15.022 11.808,15.185 210.933,15.877 143.913,16.14 52.129,16.36 52.796,16.36 53.415,16.341 4.644,16.471 109.459,16.794 24.914,16.828 129.994,17.018 25.577,17.077 212.362,17.556 215.503,17.556 213.138,17.559 216.471,17.559 204.496,17.601 205.516,17.611 207.706,17.613 208.738,17.613 209.725,17.613 214.024,17.611 206.533,17.636 71.371,18 77.937,18 84,18 93.741,18 103.195,18 112.249,18.081 58.821,18.1 64,18.1 2.54,18.294 7.981,18.272 20.268,18.329 51.405,18.328 39.966,18.382
  other v2: 120.035,2.21 118.808,2.322 109.352,3.997 143.044,4.769 63.254,5.587 135.711,5.837 138.311,5.837 143.705,5.833 134.429,5.882 139.618,5.884 99.005,7.485 100.14,7.481 168.889,7.885 167.377,7.906 133.311,8.237 134.539,8.237 135.711,8.237 138.311,8.237 139.646,8.237 140.711,8.237 159.644,8.304 158.516,8.329 159.075,8.32 162.853,9.042 96.516,9.57 158.816,10.007 159.332,9.998 170.45,10.186 166.603,10.755 133.311,10.837 134.495,10.837 135.711,10.837 138.311,10.837 139.646,10.837 140.711,10.837 114.653,10.927 118.785,12.647 164.486,12.717 113.892,13.067 119.965,13.071 134.495,13.232 135.711,13.237 136.492,13.232 137.405,13.237 138.311,13.237 139.609,13.235 141.947,13.433 127.905,13.498 125.036,14.07 157.921,14.164 159.143,14.164 142.316,14.537 132.851,14.599 136.51,14.645 138.422,14.67 134.011,14.826 135.396,14.937 159.556,15.004 141.377,15.116 153.098,15.141 154.969,15.141 139.519,15.182 148.988,15.91 169.506,16.44 162.311,17.427 168.363,17.448
FLASH_DEC_A: U1.81 U6.1 | length 44.1
  Top Layer w0.15: U6.1@101.021,12.037 101.033,12.026 102.291,12.026 v2(102.302,12.015) ; v2(140.464,18.222) 140.487,18.199 140.487,17.286 U1.81@140.511,17.262
  Layer 3 SIG w0.15: v2(102.302,12.015) 103.546,10.77 113.027,10.77 113.813,11.556 119.868,11.556 124.206,15.894 130.617,15.894 131.606,16.883 139.219,16.883 140.36,18.024 140.36,18.052 140.464,18.155 v2(140.464,18.222)
FLASH_DEC_B: U1.82 U6.2 | length 43.6
  Top Layer w0.15: U6.2@101.021,12.687 101.033,12.676 102.257,12.676 v2(102.268,12.665) ; v2(139.889,18.222) 139.889,18.155 139.982,18.062 139.982,17.291 U1.82@140.011,17.262
  Layer 3 SIG w0.15: v2(102.268,12.665) 103.886,11.047 112.839,11.047 113.625,11.833 119.746,11.833 124.083,16.171 130.502,16.171 131.491,17.16 138.901,17.16 139.776,18.035 139.776,18.041 139.889,18.155 v2(139.889,18.222)
FLASH_DEC_C: U1.86 U6.3 | length 41.6
  Top Layer w0.15: U6.3@101.021,13.337 101.055,13.304 102.268,13.304 v2(102.302,13.27) ; v2(137.816,18.226) 137.864,18.178 137.864,18.025 138.011,17.878 U1.86@138.011,17.262
  Layer 3 SIG w0.15: v2(102.302,13.27) 104.247,11.324 112.71,11.324 113.496,12.11 119.623,12.11 123.961,16.448 130.255,16.448 131.244,17.437 137.059,17.437 137.816,18.194 v2(137.816,18.226)
GATE: C137.2 Q7.1 TP91.1 U28.21 | length 7.8
  Top Layer w0.3: v1(181.085,12.267) 181.085,12.185 181.182,12.089 U28.21@181.182,10.59
  Bottom Layer w0.3: Q7.1@177.895,7.984 177.895,9.836 C137.2@177.949,9.89 177.949,9.917 178.181,10.149 178.312,10.149 179.544,11.381 TP91.1@179.544,11.478 ; TP91.1@179.555,11.546 180.365,11.546 v1(181.085,12.267)
GND: C67.1 C68.1 C69.1 C74.1 C75.1 C76.1 C82.1 C83.1 C84.1 C113.1 C117.1 C118.1 C119.1 C122.2 C157.1 C158.1 C161.1 C162.1 C163.1 C164.1 C165.1 C166.1 C167.1 C168.1 C169.1 C170.1 C171.1 C172.1 C177.1 C178.1 C179.1 C180.1 C246.1 C247.1 C248.1 C249.1 Q2.1 Q2.2 Q2.3 Q4.1 Q4.2 Q4.3 Q6.1 Q6.2 Q6.3 R70.2 R75.2 R76.2 R160.2 R170.1 R175.2 R182.1 R209.1 R214.1 R215.1 R239.2 R288.2 U27.6 U27.14 U27.15 U28.48 U28.49 U31.4 U32.4 X32.1 | length 107.9
  Top Layer w0.2: U28.49@182.432,6.42 182.482,6.37 185.182,3.67 v1(185.182,3.576) U28.48@185.182,2.25
  Top Layer w0.3: v1(182.26,13.009) 182.241,13.028 182.241,13.91 182.523,14.192 182.809,14.192 U27.6@182.835,14.218 ; v2(182.837,14.216) 183.218,14.216 U27.6@183.222,14.22 183.25,14.192 184.118,14.192 184.652,13.659 185.593,13.659 186.284,12.968 v1(187.034,12.967)
  Top Layer w0.5: R170.1@180.405,17.904 180.46,17.904 v1(180.57,17.794) 180.68,17.684 181.328,17.684 181.64,17.373 181.64,17.191 181.65,17.181 v1(181.67,17.181) ; 184.688,16.93 186.098,15.52 U27.15@186.174,15.52 186.301,15.647 186.301,17.142 ; v1(186.961,16.392) 187.122,16.392 187.156,16.426 187.156,16.605 187.966,17.416 v1(187.982,17.416) 188.009,17.416 188.055,17.461 U27.14@188.672,17.461
  Top Layer w0.6: v1(180.926,13.161) 180.95,13.161 v1@180.974,13.137 ; U28.49@182.482,6.37 185.348,6.37 ; U28.49@184.383,8.371 184.583,8.571 185.359,8.571 185.38,8.592 ; v1(202.132,9.041) 202.248,8.924 202.248,7.044 C164.1@202.366,6.927 ; v2(218.556,11.943) 218.625,11.873 218.625,10.927 ; v1(218.715,1.871) 218.717,1.869 223.756,1.869 v1(223.759,1.866) ; 218.748,15.171 218.748,16.078 v2(218.797,16.127) ; 218.798,16.699 218.798,16.128 v2(218.797,16.127) ; 219.201,16.716 219.201,16.476 ; 219.343,15.351 219.343,15.636 R288.2@218.852,16.127 ; 232.217,16.528 232.207,16.539 v1(228.306,16.539) v1(225.805,16.539) v1(220.757,16.539) 220.695,16.476 219.201,16.476 ; C172.1@232.6,1.674 C171.1@235.827,1.674 ; C84.1@264.513,1.792 C84.1@264.598,1.707 ; v1(266.424,1.688) 266.877,1.688 266.964,1.601 v1(267.036,1.673) ; v2(218.797,16.127) R288.2@218.852,16.127 ; R288.2@218.852,16.127 219.201,16.476
  Top Layer w0.8: C84.1@264.548,1.794 265.911,1.794 266.22,1.485 266.222,1.485 v1(266.424,1.688)
  Top Layer w1: U28.49@180.49,8.362 U28.49@182.432,6.42 U28.49@184.383,8.371
  Layer 2 GND w0.2: v1(186.958,14.6) 186.959,14.601 v1(186.961,16.392) v1(186.961,16.392)
  Layer 2 GND w1: 255.1,1.844 X32.1@256.5,1.844 ; 256.486,0.841 256.486,1.83 X32.1@256.5,1.844 ; X32.1@256.501,1.845 256.501,3.321 ; 257.9,1.844 X32.1@256.5,1.844
  Layer 9 GND w1: 254.5,1.844 X32.1@256.5,1.844 ; 256.486,3.321 256.486,1.858 X32.1@256.5,1.844 ; 256.505,0.806 256.505,1.839 X32.1@256.5,1.844 ; 258.258,1.844 X32.1@256.5,1.844
  Layer 4 GND w1: 255.1,1.844 X32.1@256.5,1.844 ; X32.1@256.501,1.845 256.501,3.321 ; 256.51,0.811 256.51,1.834 X32.1@256.5,1.844 ; 258.24,1.844 X32.1@256.5,1.844
  Layer 7 GND w1: 255,1.717 256.373,1.717 X32.1@256.486,1.83 ; 256.486,0.841 X32.1@256.486,1.83 ; 256.486,3.321 256.486,1.858 X32.1@256.5,1.844 ; 258.5,1.844 X32.1@256.5,1.844 ; X32.1@256.486,1.83 X32.1@256.5,1.844
  Bottom Layer w0.2: v1(186.958,14.6) 187.019,14.661 187.019,16.334 v1(186.961,16.392)
  Bottom Layer w0.3: v1(272.734,1.502) 273.015,1.783 273.846,1.783 ; Q6.2@272.858,2.841 272.985,2.714 273.846,2.714 ; Q6.3@272.858,4.111 272.985,3.984 273.846,3.984 ; Q4.1@272.877,7.427 273.09,7.64 273.865,7.64 ; Q4.2@272.877,8.697 273.09,8.91 273.865,8.91 ; Q4.3@272.877,9.967 273.004,10.094 273.865,10.094 ; Q2.1@272.877,13.697 273.102,13.922 273.912,13.922 ; Q2.2@272.877,14.967 272.895,14.985 273.857,14.985 ; Q2.3@272.877,16.237 273.004,16.11 273.865,16.11
  Bottom Layer w1: v1(182.387,6.395) 183.007,7.014 v1(183.007,7.579) ; 254.846,1.717 256.373,1.717 X32.1@256.5,1.844 256.844,1.5 258.768,1.5 R75.2@259.159,1.108 259.159,2.131 259.205,2.177 256.833,2.177 256.501,1.845 256.501,3.521
  other v1: 286.329,0.595 291.029,0.63 294.217,0.642 299.32,0.748 266.568,1.091 267.165,1.083 202.751,1.4 204.232,1.405 215.825,1.447 270.853,1.502 271.456,1.502 272.068,1.502 231.675,1.673 233.556,1.673 234.934,1.674 236.692,1.669 221.25,1.866 294.241,2.034 270.837,2.105 271.446,2.105 272.057,2.105 272.734,2.105 270.854,2.711 271.456,2.711 272.068,2.711 272.734,2.711 294.216,3.294 216.85,3.483 211.752,4.574 294.258,4.853 211.004,5.205 202.177,5.951 292.507,6.456 299.4,6.479 286.269,6.523 290.343,6.532 294.289,6.519 210.326,6.926 270.842,7.088 271.446,7.088 272.058,7.088 272.742,7.088 266.507,7.283 267.782,7.414 264.579,7.448 270.832,7.733 271.436,7.733 272.047,7.733 272.731,7.733 210.361,7.921 202.604,7.973 234.849,8.066 293.094,8.1 295.536,8.106 294.276,8.13 226.215,8.137 270.842,8.371 271.446,8.371 272.058,8.371 272.723,8.371 222.154,8.945 223.353,8.953 231.675,8.962 233.556,8.962 229.412,9.075 294.23,9.54 224.74,10.425 294.23,11.073 295.91,12.699 297.432,12.714 292.418,12.753 294.23,12.737 299.313,12.76 290.358,12.805 286.213,12.846 264.685,13.084 266.522,13.102 270.842,13.158 271.446,13.158 272.058,13.158 272.742,13.158 270.832,13.803 271.436,13.803 272.047,13.803 272.731,13.803 295.414,14.136 293.21,14.184 270.842,14.441 271.446,14.441 272.058,14.441 272.723,14.441 294.161,15.463 186.961,15.5 223.272,16.539 230.771,16.539 259.074,16.91 260.433,17.611 294.133,18.017 299.13,18.027 261.908,18.087 262.692,18.087 259.472,18.122 284.032,18.376
  other v2: 267.612,13.198
GPIO-84: TP1.1 U1.85 | length 1
  Top Layer w0.3: v2(138.5,18.227) 138.511,18.217 U1.85@138.511,17.262
I2C_A_SCL: R107.1 R199.2 U1.99 | length 25.4
  Top Layer w0.127: v2(131.41,18.2) 131.41,18.126 131.478,18.058 131.478,17.295 U1.99@131.511,17.262
  Layer 3 SIG w0.127: v2(112.305,12.717) 113.045,13.457 115.146,13.457 115.167,13.436 116.866,13.436 118.448,15.017 119.828,15.017 123.063,18.252 131.358,18.252 v2(131.41,18.2)
  Bottom Layer w0.15: v2(112.305,12.717) 112.983,13.396 112.983,14.198 R107.1@113.842,15.056
I2C_A_SDA: R108.1 R200.2 U1.98 | length 24.3
  Top Layer w0.127: U1.98@132.011,17.262 132.016,17.267 132.016,18.219 v2(132.02,18.224)
  Layer 3 SIG w0.127: v2(113.842,14.056) 114.451,14.666 116.087,14.666 117.639,16.217 120.669,16.217 123.056,18.605 131.639,18.605 v2(132.02,18.224)
  Bottom Layer w0.15: R200.2@112.32,11.627 113.384,12.691 113.384,13.548 R108.1@113.892,14.056